# Altium PCB QSTL_QD4_2SET_38PAD.PcbDoc (part 2 of 2)
Units mm, origin at the board's own origin, x right, y up, seen from the top; angles counter-clockwise.
Board outline 32.6 x 99.03 mm, 6 copper layers (L1_GND, L2_DC_A, L3_DC_B, L4_GND, L5_GND, L6_RF_QD), stack 1.588 mm thick; 50 components, 71 nets, 241 pads, 1590 vias.
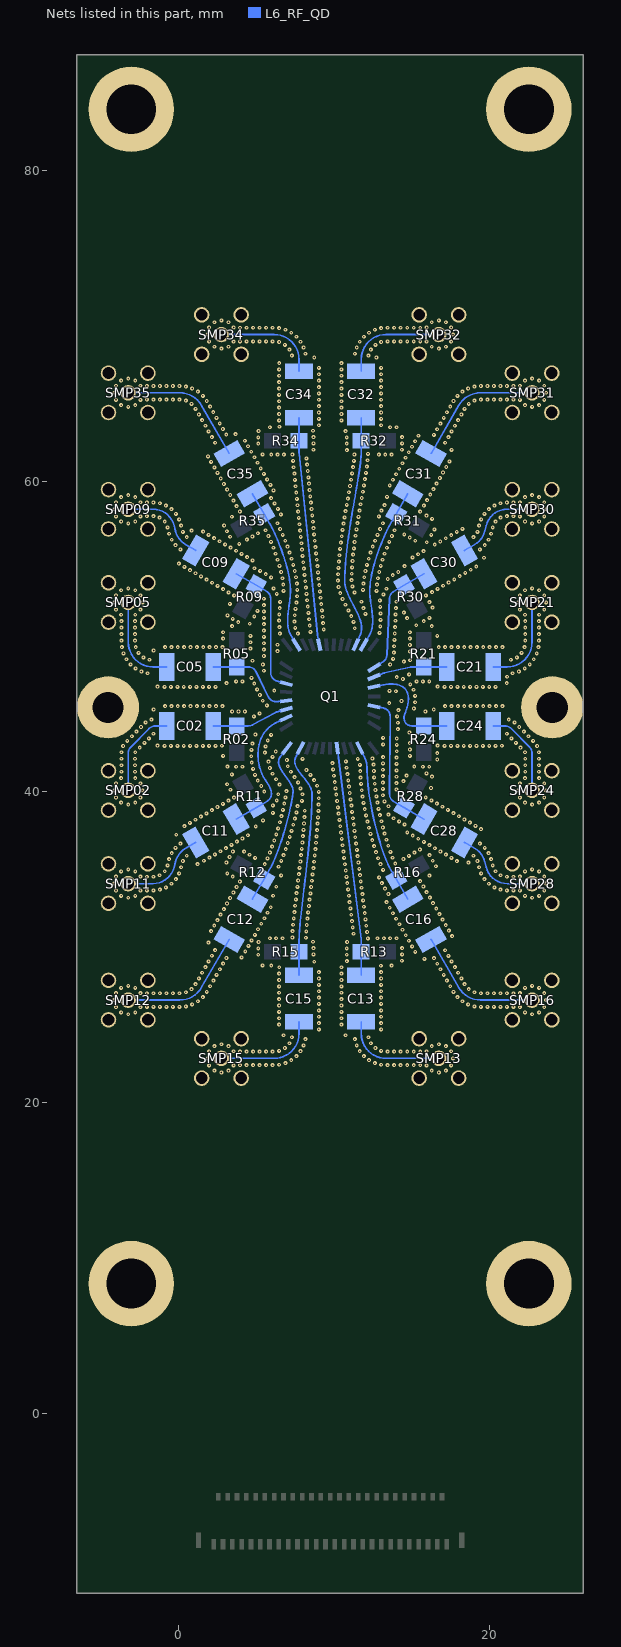
[diagram p6: the nets of this part, all layers, seen from the top]

## Via types
v1: diameter 0.25, hole 0.1, L5_GND to L6_RF_QD, 1514 vias
v2: diameter 0.4, hole 0.2, L1_GND to L6_RF_QD, 38 vias
v3: diameter 0.3, hole 0.2, L1_GND to L6_RF_QD, 22 vias
v4: diameter 0.5, hole 0.25, L1_GND to L6_RF_QD, 16 vias

## Nets (pads, with @x,y where several pads share a name; then routed paths per layer and width w, separated by ;. In a path a pad name is that pad's centre, name@x,y a point inside that pad or via, vN(x,y) a via of type N, cw(c..) or ccw(c..) an arc to the next point about the centre after c; other vN are vias at no path point) (continued)
GND: pad.A3 pad.A4 pad.P1 pad.P2 pad.P3 pad.P4 SMP02.2 SMP02.3 SMP02.4 SMP02.5 SMP05.2 SMP05.3 SMP05.4 SMP05.5 SMP09.2 SMP09.3 SMP09.4 SMP09.5 SMP11.2 SMP11.3 SMP11.4 SMP11.5 SMP12.2 SMP12.3 SMP12.4 SMP12.5 SMP13.2 SMP13.3 SMP13.4 SMP13.5 SMP15.2 SMP15.3 SMP15.4 SMP15.5 SMP16.2 SMP16.3 SMP16.4 SMP16.5 SMP21.2 SMP21.3 SMP21.4 SMP21.5 SMP24.2 SMP24.3 SMP24.4 SMP24.5 SMP28.2 SMP28.3 SMP28.4 SMP28.5 SMP30.2 SMP30.3 SMP30.4 SMP30.5 SMP31.2 SMP31.3 SMP31.4 SMP31.5 SMP32.2 SMP32.3 SMP32.4 SMP32.5 SMP34.2 SMP34.3 SMP34.4 SMP34.5 SMP35.2 SMP35.3 SMP35.4 SMP35.5
  other v1: 2.75,21.94 16.75,21.94 2.295,22.062 3.205,22.062 16.295,22.062 17.205,22.062 1.962,22.395 3.538,22.395 3.948,22.412 4.368,22.412 4.788,22.412 5.208,22.412 5.628,22.412 6.048,22.412 13.452,22.412 13.872,22.412 14.292,22.412 14.712,22.412 15.132,22.412 15.552,22.412 15.962,22.395 17.538,22.395 6.467,22.437 13.033,22.437 6.872,22.544 12.628,22.544 7.247,22.732 12.253,22.732 1.84,22.85 17.66,22.85 7.575,22.993 11.925,22.993 3.948,23.288 4.368,23.288 4.788,23.288 5.208,23.288 5.628,23.288 6.048,23.288 13.452,23.288 13.872,23.288 14.292,23.288 14.712,23.288 15.132,23.288 15.552,23.288 1.962,23.305 3.538,23.305 7.843,23.315 11.657,23.315 15.962,23.305 17.538,23.305 6.464,23.331 13.036,23.331 6.839,23.515 12.661,23.515 2.295,23.638 3.205,23.638 16.295,23.638 17.205,23.638 8.039,23.686 11.461,23.686 2.75,23.76 16.75,23.76 7.126,23.819 12.374,23.819 8.156,24.089 11.344,24.089 7.286,24.205 12.214,24.205 6.751,24.333 10.751,24.333 9.03,24.711 13.03,24.711 6.47,25.023 10.47,25.023 9.03,25.121 13.03,25.121 6.47,25.433 10.47,25.433 9.03,25.531 13.03,25.531 -3.25,25.69 22.75,25.69 -3.705,25.812 -2.795,25.812 22.295,25.812 23.205,25.812 6.47,25.843 10.47,25.843 9.03,25.941 13.03,25.941 -4.038,26.145 -2.462,26.145 21.962,26.145 23.538,26.145 -2.052,26.162 -1.632,26.162 -1.212,26.162 -0.792,26.162 -0.372,26.162 0.048,26.162 19.452,26.162 19.872,26.162 20.292,26.162 20.712,26.162 21.132,26.162 21.552,26.162 0.466,26.2 19.034,26.2 6.47,26.253 10.47,26.253 0.867,26.322 18.633,26.322 9.03,26.351 13.03,26.351 1.234,26.524 18.266,26.524 -4.16,26.6 23.66,26.6 6.47,26.663 10.47,26.663 9.03,26.761 13.03,26.761 1.552,26.797 17.948,26.797 -2.052,27.038 -1.632,27.038 -1.212,27.038 -0.792,27.038 -0.372,27.038 0.048,27.038 19.452,27.038 19.872,27.038 20.292,27.038 20.712,27.038 21.132,27.038 21.552,27.038 -4.038,27.055 -2.462,27.055 21.962,27.055 23.538,27.055 6.47,27.073 10.47,27.073 0.461,27.104 19.039,27.104 1.808,27.129 17.692,27.129 9.03,27.171 13.03,27.171 0.823,27.312 18.677,27.312 -3.705,27.388 -2.795,27.388 22.295,27.388 23.205,27.388 2.019,27.493 6.47,27.483 10.47,27.483 17.481,27.493 -3.25,27.51 22.75,27.51 9.03,27.581 13.03,27.581 1.089,27.634 18.411,27.634 2.229,27.856 17.271,27.856 6.47,27.893 10.47,27.893 1.299,27.998 9.03,27.991 13.03,27.991 18.201,27.998 2.439,28.22 17.061,28.22 6.47,28.303 10.47,28.303 1.509,28.361 17.991,28.361 9.03,28.401 13.03,28.401 2.649,28.584 16.851,28.584 6.47,28.713 10.47,28.713 1.719,28.725 17.781,28.725 13.014,28.809 5.401,28.833 5.957,28.82 13.707,28.82 16.646,28.939 2.859,28.948 1.929,29.089 8.726,29.072 17.571,29.089 10.83,29.114 14.374,29.131 15.818,29.251 3.069,29.311 16.436,29.303 4.048,29.349 17.366,29.444 2.139,29.453 5.12,29.523 10.82,29.523 8.68,29.541 14.38,29.541 15.23,29.708 4.287,29.737 2.349,29.816 17.156,29.808 5.12,29.933 10.82,29.933 8.68,29.951 14.38,29.951 15.025,30.063 4.492,30.093 1.911,30.298 5.147,30.34 10.847,30.34 8.646,30.356 14.82,30.418 4.697,30.448 5.866,30.58 6.276,30.58 6.686,30.58 12.18,30.576 12.796,30.58 13.206,30.58 13.616,30.58 14.026,30.579 8.191,30.618 7.315,30.631 17.603,30.717 14.615,30.773 4.902,30.803 11.26,30.874 12.129,30.983 2.085,31.043 7.336,31.04 8.213,31.027 17.398,31.072 14.41,31.128 5.107,31.158 11.209,31.281 2.29,31.398 12.079,31.39 17.193,31.427 7.369,31.449 8.248,31.436 14.205,31.483 5.312,31.513 11.159,31.688 2.495,31.753 16.988,31.782 12.028,31.797 14,31.838 7.409,31.857 8.288,31.844 5.517,31.868 2.7,32.108 11.108,32.095 16.783,32.137 13.795,32.193 11.977,32.204 5.722,32.223 7.452,32.265 8.332,32.251 2.905,32.463 16.578,32.492 11.057,32.502 13.59,32.548 5.927,32.578 11.927,32.611 7.499,32.672 8.379,32.659 3.11,32.818 16.373,32.847 13.385,32.904 11.007,32.909 11.876,33.017 7.546,33.079 8.427,33.066 3.315,33.173 -3.25,33.19 16.168,33.203 22.75,33.19 -3.705,33.312 -2.795,33.312 22.295,33.312 23.205,33.312 6.075,33.321 10.956,33.315 11.825,33.424 13.496,33.431 7.595,33.486 8.476,33.473 3.52,33.528 15.963,33.558 -4.038,33.645 -2.462,33.645 -2.052,33.662 -1.632,33.662 21.132,33.662 21.552,33.662 21.962,33.645 23.538,33.645 -1.216,33.714 20.716,33.714 10.905,33.722 13.283,33.78 11.775,33.831 -0.823,33.859 20.323,33.859 3.725,33.883 6.284,33.896 7.644,33.893 8.524,33.88 15.758,33.913 -0.472,34.089 19.972,34.089 -4.16,34.1 23.66,34.1 10.855,34.129 13.078,34.135 3.936,34.234 11.724,34.238 15.54,34.258 7.692,34.301 8.573,34.287 -0.183,34.392 19.683,34.392 12.898,34.501 -4.038,34.555 -2.462,34.555 -2.052,34.538 -1.632,34.538 3.481,34.548 10.804,34.536 21.132,34.538 21.552,34.538 21.962,34.555 23.538,34.555 16.135,34.615 -1.227,34.636 6.598,34.634 11.673,34.645 20.727,34.636 7.741,34.708 8.621,34.694 0.029,34.753 3.126,34.753 19.471,34.753 -3.705,34.888 -2.795,34.888 -0.901,34.896 20.401,34.896 22.295,34.888 23.205,34.888 10.753,34.943 13.163,34.982 -3.25,35.01 22.75,35.01 11.623,35.052 7.788,35.115 8.668,35.102 0.158,35.152 19.342,35.152 6.436,35.183 16.557,35.217 -0.716,35.269 20.216,35.269 1.216,35.353 5.543,35.353 10.703,35.35 12.992,35.355 13.939,35.389 3.076,35.459 11.572,35.459 18.65,35.452 8.714,35.509 7.834,35.522 0.273,35.556 1.617,35.57 6.6,35.558 17.912,35.553 19.227,35.556 16.357,35.575 -0.613,35.676 14.466,35.683 20.113,35.676 5.719,35.724 4.918,35.75 12.841,35.736 1.973,35.775 10.652,35.757 13.771,35.763 17.557,35.758 3.281,35.814 11.521,35.865 0.522,35.89 14.821,35.888 18.978,35.89 8.758,35.917 6.751,35.94 7.878,35.93 16.152,35.93 4.563,35.955 17.202,35.963 2.328,35.98 -0.451,36.063 19.951,36.063 5.875,36.103 15.176,36.093 12.704,36.123 13.624,36.146 3.486,36.168 4.207,36.16 10.601,36.164 16.847,36.168 2.683,36.185 11.471,36.272 15.532,36.297 6.891,36.325 8.8,36.324 7.921,36.338 16.492,36.373 -0.205,36.402 3.038,36.39 19.705,36.402 6.019,36.487 12.578,36.512 13.491,36.533 10.551,36.57 16.137,36.578 3.393,36.595 0.111,36.678 11.42,36.679 19.389,36.678 7.023,36.713 8.84,36.732 7.962,36.746 15.782,36.783 3.748,36.8 6.154,36.874 12.46,36.905 13.367,36.924 10.5,36.977 15.427,36.988 4.103,37.005 11.369,37.086 7.148,37.103 8.878,37.141 7.999,37.154 15.072,37.193 4.458,37.21 -0.16,37.244 6.281,37.264 12.349,37.3 13.253,37.318 10.449,37.384 14.717,37.398 7.266,37.496 11.319,37.493 8.912,37.549 8.034,37.562 19.463,37.614 6.4,37.656 12.246,37.697 13.146,37.714 4.957,37.78 0.363,37.802 10.399,37.791 19.108,37.819 7.376,37.891 11.268,37.9 14.549,37.91 8.943,37.958 8.066,37.971 0.718,38.007 18.753,38.024 6.512,38.05 12.15,38.095 13.046,38.112 14.19,38.106 5.426,38.173 1.073,38.212 10.348,38.198 18.398,38.229 7.479,38.288 11.217,38.307 13.835,38.311 8.093,38.38 8.97,38.367 1.428,38.417 18.043,38.434 6.616,38.447 12.061,38.496 12.954,38.511 13.496,38.538 10.297,38.605 1.783,38.622 17.688,38.639 6.067,38.655 7.573,38.687 11.167,38.713 8.115,38.79 8.992,38.777 2.138,38.827 6.711,38.846 17.333,38.844 11.98,38.897 12.869,38.912 10.247,39.012 2.493,39.032 16.977,39.049 7.658,39.088 13.509,39.081 11.116,39.12 6.063,39.135 -3.25,39.19 9.008,39.186 22.75,39.19 2.848,39.237 6.797,39.247 16.622,39.254 11.906,39.301 -3.705,39.312 -2.795,39.312 12.793,39.315 22.295,39.312 23.205,39.312 13.251,39.395 7.935,39.423 10.196,39.418 3.203,39.442 6.312,39.457 16.267,39.459 11.065,39.527 9.018,39.596 -4.038,39.645 -2.462,39.645 3.562,39.64 6.871,39.65 15.906,39.649 21.962,39.645 23.538,39.645 11.841,39.705 12.725,39.719 13.141,39.788 10.145,39.825 6.408,39.852 7.969,39.849 11.015,39.934 9.014,40.006 5.505,40.023 6.929,40.056 -4.16,40.1 -2.34,40.1 11.785,40.112 21.84,40.1 23.66,40.1 3.324,40.139 12.667,40.125 14.018,40.163 13.142,40.197 7.84,40.235 10.095,40.232 16.243,40.255 10.964,40.341 5.312,40.384 8.913,40.402 6.493,40.474 3.119,40.494 11.74,40.519 12.619,40.532 -4.038,40.555 -2.462,40.555 14.021,40.573 21.962,40.555 23.538,40.555 7.684,40.62 13.145,40.607 10.044,40.639 14.468,40.701 5.088,40.727 10.913,40.748 8.72,40.763 6.273,40.817 -3.705,40.888 -2.795,40.888 22.295,40.888 23.205,40.888 11.708,40.928 7.462,40.956 12.585,40.941 14.023,40.982 16.307,40.988 13.148,41.017 9.994,41.046 14.673,41.056 4.914,41.097 8.479,41.094 3.429,41.131 10.863,41.155 6.041,41.171 15.955,41.198 -3.688,41.298 -2.812,41.298 7.224,41.301 22.312,41.298 23.188,41.298 11.691,41.337 12.567,41.35 8.222,41.414 14.026,41.392 13.151,41.427 9.943,41.453 4.786,41.487 5.873,41.544 10.812,41.561 3.136,41.633 3.692,41.62 4.102,41.62 15.166,41.633 15.722,41.62 16.132,41.62 7.019,41.657 -3.688,41.718 -2.812,41.718 22.312,41.718 23.188,41.718 11.669,41.746 12.552,41.76 14.029,41.802 13.153,41.837 9.892,41.86 4.704,41.888 5.782,41.951 10.761,41.968 6.963,42.057 16.645,42.091 -3.688,42.138 -2.812,42.138 7.976,42.126 11.524,42.126 22.312,42.138 23.188,42.138 12.466,42.155 14.032,42.212 13.156,42.247 6.045,42.255 4.667,42.296 2.855,42.323 14.885,42.323 16.645,42.501 5.545,42.532 -2.797,42.556 22.297,42.556 -3.686,42.558 23.186,42.558 6.252,42.606 14.035,42.622 4.679,42.706 14.885,42.733 -2.505,42.857 22.005,42.857 5.6,42.938 -3.575,42.96 23.075,42.96 -1.364,42.983 -0.908,42.97 -0.498,42.97 -0.088,42.97 0.322,42.97 0.732,42.97 1.142,42.97 1.552,42.97 1.962,42.97 2.372,42.97 2.782,42.973 16.666,42.983 17.122,42.97 17.532,42.97 17.942,42.97 18.352,42.97 18.762,42.97 19.172,42.97 19.582,42.97 19.992,42.97 20.402,42.97 20.812,42.973 14.038,43.032 13.162,43.067 4.741,43.111 -2.21,43.156 14.885,43.143 21.71,43.156 -3.313,43.286 22.813,43.286 5.733,43.325 14.041,43.442 -1.922,43.447 21.415,43.454 13.165,43.477 -3.018,43.584 22.518,43.584 5.954,43.669 4.942,43.699 -1.627,43.746 21.127,43.746 14.847,43.827 -2.723,43.883 22.223,43.883 14.109,44.044 -2.427,44.182 21.927,44.182 14.11,44.454 -2.127,44.475 21.627,44.475 -1.753,44.659 21.253,44.659 4.845,44.867 14.059,44.863 5.205,45.062 3.441,45.18 3.851,45.18 4.261,45.179 15.881,45.18 14.146,45.269 -1.61,45.308 16.42,45.308 15.14,45.373 2.811,45.522 20.841,45.522 -0.879,45.53 -0.469,45.53 -0.059,45.53 0.351,45.53 0.761,45.53 1.171,45.53 1.581,45.53 1.991,45.53 2.401,45.53 17.151,45.53 17.561,45.53 17.971,45.53 18.381,45.53 18.791,45.53 19.201,45.53 19.611,45.53 20.021,45.53 20.431,45.53 5.683,45.57 13.554,45.722 15.216,45.775 14.344,45.858 5.412,45.874 15.22,46.184 5.23,46.241 13.98,46.485 13.572,46.511 6.152,46.523 15.122,46.581 5.048,46.609 -0.908,46.77 -0.498,46.77 -0.088,46.77 0.322,46.77 0.732,46.77 1.142,46.77 1.552,46.77 1.962,46.77 2.372,46.77 17.122,46.77 17.532,46.77 17.942,46.77 18.352,46.77 18.762,46.77 19.172,46.77 19.582,46.77 19.992,46.77 20.402,46.77 -1.364,46.783 16.666,46.783 14.906,46.927 4.867,46.977 3.09,47.014 21.12,47.014 3.692,47.12 4.102,47.12 15.312,47.12 15.722,47.12 16.132,47.12 14.431,47.272 4.686,47.345 14.036,47.395 21.145,47.421 14.836,47.575 -2.001,47.643 21.501,47.643 -2.405,47.757 21.905,47.757 5.489,47.806 -2.776,47.951 22.276,47.951 -3.1,48.218 5.424,48.207 13.615,48.207 22.6,48.218 14.493,48.395 4.753,48.451 14.894,48.481 -1.886,48.512 21.386,48.512 -3.362,48.545 22.862,48.545 13.806,48.567 -2.273,48.669 21.773,48.669 5.487,48.752 -3.552,48.919 23.052,48.919 -2.579,48.953 22.079,48.953 13.852,48.973 14.885,49.053 6.363,49.07 -1.61,49.108 5.487,49.162 4.615,49.231 -3.662,49.323 -2.766,49.326 -0.879,49.33 -0.469,49.33 -0.059,49.33 0.351,49.33 0.761,49.33 1.171,49.33 1.581,49.33 1.991,49.33 2.401,49.33 2.811,49.322 16.741,49.329 17.151,49.33 17.561,49.33 17.971,49.33 18.381,49.33 18.791,49.33 19.201,49.33 19.611,49.33 20.021,49.33 20.431,49.33 20.841,49.322 22.266,49.326 23.162,49.323 13.871,49.382 14.885,49.463 6.362,49.48 5.486,49.572 4.615,49.641 -3.688,49.742 -2.812,49.742 22.312,49.742 23.188,49.742 13.89,49.792 2.855,49.873 14.885,49.873 5.486,49.982 4.615,50.051 16.645,50.051 -3.688,50.162 -2.812,50.162 22.312,50.162 23.188,50.162 6.511,50.199 7.673,50.192 13.91,50.201 12.936,50.238 2.855,50.283 8.476,50.304 14.885,50.283 5.486,50.392 9.34,50.466 11.334,50.543 -3.688,50.582 -2.812,50.582 7.502,50.562 22.312,50.582 23.188,50.582 6.478,50.614 13.929,50.611 3.441,50.68 12.98,50.663 16.291,50.679 8.435,50.711 15.292,50.734 5.486,50.802 4.574,50.832 9.299,50.874 3.836,50.934 11.264,50.946 7.451,50.968 -3.688,51.002 -2.812,51.002 15.78,51.001 22.312,51.002 23.188,51.002 6.468,51.03 13.948,51.02 12.999,51.083 3.481,51.139 8.394,51.119 14.703,51.191 5.485,51.212 16.135,51.206 9.258,51.282 4.864,51.308 11.111,51.325 3.142,51.365 7.47,51.377 -3.705,51.412 -2.795,51.412 22.295,51.412 23.205,51.412 6.477,51.436 13.967,51.43 12.024,51.46 12.999,51.494 8.352,51.527 14.498,51.546 5.485,51.622 5.069,51.663 9.217,51.69 10.926,51.691 -4.038,51.745 -2.462,51.745 21.962,51.745 23.538,51.745 7.52,51.784 6.504,51.837 11.892,51.841 13.987,51.84 16.344,51.87 12.975,51.915 8.311,51.935 5.485,52.032 10.735,52.054 9.175,52.098 3.294,52.109 -4.16,52.2 -2.34,52.2 7.576,52.19 21.84,52.2 23.66,52.2 16.139,52.225 6.526,52.243 11.758,52.245 14.006,52.249 12.957,52.329 8.27,52.343 10.554,52.422 5.485,52.442 9.134,52.505 7.621,52.597 -4.038,52.655 -2.462,52.655 3.572,52.657 15.916,52.653 21.962,52.655 23.538,52.655 13.177,52.72 6.312,52.754 8.229,52.751 10.401,52.802 3.212,52.853 11.321,52.852 16.317,52.87 9.093,52.913 6.759,52.945 12.741,52.945 -3.705,52.988 -2.795,52.988 22.295,52.988 23.205,52.988 7.634,53.007 11.866,53.007 2.857,53.058 13.367,53.08 16.673,53.075 -3.25,53.11 6.109,53.107 22.75,53.11 8.187,53.159 10.294,53.197 11.182,53.238 2.502,53.263 17.028,53.28 9.051,53.321 6.734,53.354 12.766,53.354 7.609,53.416 11.891,53.416 2.147,53.468 17.383,53.485 8.146,53.567 10.254,53.605 11.13,53.643 1.792,53.673 17.738,53.69 9.01,53.729 13.463,53.712 6.675,53.76 12.825,53.76 5.953,53.815 7.553,53.822 11.947,53.822 1.437,53.878 18.093,53.895 13.783,53.959 8.105,53.975 5.601,54.026 10.261,54.015 11.139,54.053 1.082,54.083 18.448,54.1 8.969,54.137 6.591,54.161 12.909,54.161 14.138,54.164 5.246,54.231 7.475,54.225 12.025,54.225 0.727,54.288 18.803,54.305 8.063,54.383 4.878,54.404 10.281,54.424 11.161,54.462 0.372,54.493 19.158,54.51 8.927,54.545 14.54,54.544 6.488,54.558 13.012,54.558 7.379,54.623 12.121,54.623 0.017,54.698 8.022,54.791 10.31,54.833 11.192,54.871 4.763,54.914 6.37,54.95 13.13,54.95 8.886,54.953 7.267,55.018 12.233,55.018 19.657,55.08 15.063,55.102 4.408,55.119 7.981,55.198 10.347,55.242 11.231,55.279 15.418,55.307 4.053,55.324 6.238,55.339 13.262,55.339 8.845,55.361 7.142,55.408 12.358,55.408 15.773,55.512 3.698,55.529 7.939,55.606 0.111,55.622 19.389,55.622 10.391,55.649 11.277,55.687 3.343,55.734 6.095,55.723 13.405,55.723 8.803,55.769 7.005,55.795 12.495,55.795 -0.205,55.898 19.705,55.898 2.988,55.939 16.483,55.922 3.899,55.977 7.898,56.014 10.441,56.056 11.329,56.093 15.967,56.075 5.941,56.103 13.559,56.103 2.633,56.144 16.838,56.127 6.858,56.177 8.762,56.177 12.642,56.177 15.229,56.176 -0.451,56.237 4.388,56.244 19.951,56.237 2.277,56.349 17.193,56.332 14.874,56.381 0.522,56.41 7.857,56.422 18.978,56.41 3.311,56.434 4.743,56.449 10.495,56.463 5.776,56.478 11.385,56.499 13.724,56.478 16.256,56.55 17.548,56.537 1.922,56.554 6.7,56.556 12.8,56.556 8.721,56.585 14.519,56.586 -0.613,56.624 20.113,56.624 5.098,56.654 0.273,56.744 17.903,56.742 19.227,56.744 1.567,56.759 3.106,56.789 0.833,56.831 7.815,56.83 5.597,56.847 13.903,56.847 10.554,56.868 11.446,56.905 16.461,56.905 6.532,56.93 12.968,56.93 18.262,56.94 8.679,56.993 -0.716,57.031 20.216,57.031 0.158,57.148 2.926,57.154 19.342,57.148 7.774,57.238 10.617,57.274 -3.25,57.29 6.35,57.297 11.51,57.31 13.15,57.297 22.75,57.29 -3.705,57.412 -2.795,57.412 -0.901,57.404 8.638,57.4 20.401,57.404 22.295,57.412 23.205,57.412 0.029,57.547 19.471,57.547 16.31,57.584 -1.227,57.664 7.733,57.646 20.727,57.664 10.682,57.678 11.576,57.714 -4.038,57.745 -2.462,57.745 3.429,57.722 12.894,57.739 21.962,57.745 23.538,57.745 -2.052,57.762 -1.632,57.762 21.132,57.762 21.552,57.762 15.955,57.789 8.597,57.808 6.584,57.871 -0.183,57.908 19.683,57.908 15.548,58.049 3.943,58.058 7.691,58.054 10.749,58.083 11.644,58.119 13.048,58.113 -4.16,58.2 23.66,58.2 -0.472,58.211 6.385,58.229 8.555,58.216 19.972,58.211 3.73,58.408 -0.823,58.441 15.787,58.437 20.323,58.441 7.65,58.462 13.253,58.468 10.818,58.487 11.714,58.523 6.18,58.584 -1.216,58.586 20.716,58.586 8.514,58.624 -4.038,58.655 -2.462,58.655 -2.052,58.638 -1.632,58.638 21.132,58.638 21.552,58.638 21.962,58.655 23.538,58.655 3.525,58.763 15.992,58.793 7.609,58.87 10.889,58.891 5.948,58.918 11.784,58.927 -3.705,58.988 -2.795,58.988 22.295,58.988 23.205,58.988 13.411,58.998 8.473,59.032 -3.25,59.11 3.32,59.118 22.75,59.11 16.197,59.148 7.567,59.278 10.959,59.295 11.855,59.331 6.103,59.417 8.432,59.44 3.115,59.473 16.402,59.503 7.526,59.686 11.029,59.699 11.924,59.735 13.585,59.743 5.898,59.772 2.91,59.828 8.39,59.848 16.607,59.858 7.485,60.093 11.098,60.103 13.79,60.098 5.693,60.127 11.992,60.139 2.705,60.183 16.812,60.213 8.349,60.256 13.995,60.453 5.488,60.482 7.444,60.501 11.164,60.508 2.5,60.538 12.056,60.544 17.017,60.568 8.308,60.664 14.2,60.808 5.283,60.837 2.295,60.893 7.402,60.909 11.224,60.913 17.222,60.923 12.114,60.95 8.266,61.072 14.405,61.163 5.078,61.192 2.09,61.248 17.427,61.278 7.361,61.317 11.276,61.32 12.161,61.357 8.225,61.48 14.61,61.518 4.873,61.547 1.885,61.604 5.401,61.733 5.957,61.72 6.367,61.72 6.777,61.72 7.32,61.725 11.309,61.728 12.887,61.72 13.297,61.72 13.707,61.72 12.187,61.766 14.815,61.873 4.668,61.903 10.83,62.014 8.674,62.031 14.374,62.031 17.575,62.021 15.02,62.228 4.463,62.258 5.12,62.423 8.68,62.441 10.82,62.423 14.38,62.441 2.349,62.484 17.151,62.484 15.225,62.583 4.258,62.613 2.139,62.847 5.12,62.833 8.68,62.851 10.82,62.833 14.38,62.851 17.361,62.847 15.436,62.934 16.431,62.989 3.059,63.006 3.659,63.042 1.929,63.211 10.751,63.233 17.571,63.211 5.147,63.24 8.646,63.256 16.641,63.352 2.849,63.37 5.866,63.48 13.616,63.48 14.026,63.479 6.48,63.514 1.719,63.575 17.781,63.575 9.03,63.611 13.03,63.611 2.644,63.725 16.851,63.716 1.509,63.939 6.47,63.923 10.47,63.923 17.991,63.939 9.03,64.021 13.03,64.021 2.434,64.089 17.061,64.08 1.299,64.302 18.201,64.302 6.47,64.333 10.47,64.333 2.224,64.452 9.03,64.431 13.03,64.431 17.271,64.444 1.089,64.666 18.411,64.666 6.47,64.743 10.47,64.743 -3.25,64.79 2.019,64.807 17.481,64.807 22.75,64.79 9.03,64.841 13.03,64.841 -3.705,64.912 -2.795,64.912 22.295,64.912 23.205,64.912 0.823,64.988 18.677,64.988 6.47,65.153 10.47,65.153 1.808,65.171 17.692,65.171 0.461,65.196 19.039,65.196 -4.038,65.245 -2.462,65.245 -2.052,65.262 -1.632,65.262 -1.212,65.262 -0.792,65.262 -0.372,65.262 0.048,65.262 9.03,65.251 13.03,65.251 19.452,65.262 19.872,65.262 20.292,65.262 20.712,65.262 21.132,65.262 21.552,65.262 21.962,65.245 23.538,65.245 1.552,65.503 17.948,65.503 6.47,65.563 10.47,65.563 9.03,65.661 13.03,65.661 -4.16,65.7 23.66,65.7 1.234,65.776 18.266,65.776 6.47,65.973 10.47,65.973 0.867,65.978 18.633,65.978 9.03,66.071 13.03,66.071 0.466,66.1 19.034,66.1 -2.052,66.138 -1.632,66.138 -1.212,66.138 -0.792,66.138 -0.372,66.138 0.048,66.138 19.452,66.138 19.872,66.138 20.292,66.138 20.712,66.138 21.132,66.138 21.552,66.138 -4.038,66.155 -2.462,66.155 21.962,66.155 23.538,66.155 6.47,66.383 10.47,66.383 9.03,66.481 13.03,66.481 -3.705,66.488 -2.795,66.488 22.295,66.488 23.205,66.488 -3.25,66.61 22.75,66.61 6.47,66.793 10.47,66.793 9.03,66.891 13.03,66.891 6.47,67.203 10.47,67.203 9.03,67.301 13.03,67.301 6.47,67.613 10.47,67.613 8.726,67.972 12.726,67.972 7.286,68.095 12.214,68.095 8.156,68.211 11.344,68.211 7.126,68.481 12.374,68.481 2.75,68.54 16.75,68.54 8.039,68.614 11.461,68.614 2.295,68.662 3.205,68.662 16.295,68.662 17.205,68.662 6.839,68.785 12.661,68.785 6.464,68.969 13.036,68.969 1.962,68.995 3.538,68.995 7.843,68.985 11.657,68.985 15.962,68.995 17.538,68.995 3.948,69.012 4.368,69.012 4.788,69.012 5.208,69.012 5.628,69.012 6.048,69.012 13.452,69.012 13.872,69.012 14.292,69.012 14.712,69.012 15.132,69.012 15.552,69.012 7.575,69.307 11.925,69.307 1.84,69.45 17.66,69.45 7.247,69.568 12.253,69.568 6.872,69.756 12.628,69.756 3.948,69.888 4.368,69.888 4.788,69.888 5.208,69.888 5.628,69.888 6.048,69.888 6.467,69.863 13.033,69.863 13.452,69.888 13.872,69.888 14.292,69.888 14.712,69.888 15.132,69.888 15.552,69.888 1.962,69.905 3.538,69.905 15.962,69.905 17.538,69.905 2.295,70.238 3.205,70.238 16.295,70.238 17.205,70.238 2.75,70.36 16.75,70.36
MW02: C34.2 Q1.2 R34.1 | length 14.3
  L6_RF_QD w0.11: C34.2@7.75,64.1 R34.1@7.75,62.6 7.75,61.85 ccw(c8.3,61.85) 7.751,61.822 ccw(c8.3,61.85) 7.753,61.795 8.935,50.123 ccw(c9.482,50.178) 8.937,50.105 ccw(c9.482,50.178) 8.94,50.088 ccw(c9.308,50.149) 8.941,50.082 cw(c7.644,49.846) 8.942,50.077 ccw(c15.479,51.239) 8.96,49.978 cw(c-10.597,46.197) 8.979,49.88
MW05: C35.2 Q1.5 R35.1 | length 9.9
  L6_RF_QD w0.11: C35.2@4.75,59.201 R35.1@5.5,57.902 5.875,57.252 cw(c2.147,55.1) 5.964,57.091 cw(c-1.705,53.091) 6.047,56.926 cw(c-2.907,52.496) 6.15,56.712 cw(c-5.631,51.228) 6.249,56.495 cw(c-6.814,50.704) 6.479,55.946 cw(c-6.983,50.637) 6.685,55.388 cw(c-6.066,50.956) 6.789,55.077 cw(c-4.507,51.456) 6.885,54.763 cw(c-3.64,51.708) 6.972,54.446 cw(c-1.734,52.199) 7.049,54.125 cw(c-0.817,52.4) 7.111,53.813 cw(c1.02,52.728) 7.158,53.499 cw(c1.796,52.825) 7.187,53.209 cw(c3.341,52.935) 7.197,52.918 cw(c3.735,52.933) 7.191,52.734 cw(c2.044,53.031) 7.177,52.551 cw(c0.636,53.162) 7.157,52.364 cw(c-6.174,53.996) 7.133,52.178 cw(c-38.142,58.363) 7.08,51.802 ccw(c15.074,50.643) 7.034,51.426 ccw(c12.438,50.899) 7.019,51.242 ccw(c10.64,51.013) 7.013,51.057 ccw(c10.08,51.02) 7.016,50.879 ccw(c9.31,50.984) 7.031,50.7 ccw(c9.044,50.951) 7.06,50.528 ccw(c8.695,50.877) 7.105,50.359 ccw(c8.613,50.85) 7.136,50.274 ccw(c8.537,50.821) 7.171,50.19 ccw(c8.522,50.814) 7.19,50.152 ccw(c8.507,50.806) 7.209,50.114 ccw(c8.505,50.805) 7.219,50.095 ccw(c8.502,50.803) 7.23,50.076 ccw(c8.261,50.666) 7.237,50.064 ccw(c11.453,52.541) 7.244,50.052 ccw(c19.769,57.461) 7.296,49.966 cw(c-30.126,27.48) 7.347,49.88
MW09: C09.2 Q1.9 R09.1 | length 8.5
  L6_RF_QD w0.11: C09.2@3.699,54.05 R09.1@4.998,53.3 5.648,52.925 cw(c5.373,52.449) 5.849,52.724 cw(c5.373,52.449) 5.923,52.449 5.925,47.675 ccw(c6.475,47.675) 5.956,47.494 ccw(c6.475,47.675) 6.045,47.333 ccw(c6.475,47.675) 6.106,47.268 ccw(c6.475,47.675) 6.176,47.213 ccw(c6.475,47.675) 6.217,47.189 ccw(c6.475,47.675) 6.26,47.169 ccw(c6.475,47.675) 6.282,47.16 ccw(c6.475,47.675) 6.305,47.152 ccw(c6.443,47.575) 6.316,47.149 ccw(c6.853,48.953) 6.327,47.145 ccw(c8.149,53.417) 6.424,47.118 cw(c1.246,28.22) Q1.9@6.52,47.091
MW11: C05.2 Q1.11 R05.1 | length 5.5
  L6_RF_QD w0.11: C05.2@2.235,48.05 R05.1@3.735,48.05 4.485,48.05 cw(c4.485,47.5) 4.776,47.967 cw(c4.485,47.5) 4.978,47.743 5.776,46.122 ccw(c6.27,46.365) 5.875,45.982 ccw(c6.27,46.365) 6.012,45.88 ccw(c6.27,46.365) 6.088,45.846 ccw(c6.27,46.365) 6.168,45.825 ccw(c6.27,46.365) 6.209,45.819 ccw(c6.27,46.365) 6.25,45.816 ccw(c6.27,46.365) 6.274,45.815 ccw(c6.27,46.365) 6.297,45.816 ccw(c6.275,46.26) 6.309,45.817 ccw(c6.165,47.695) 6.321,45.818 ccw(c5.779,52.352) 6.42,45.827 cw(c8.345,26.249) Q1.11@6.52,45.836
MW12: C02.2 Q1.12 R02.1 | length 4.5
  L6_RF_QD w0.11: C02.2@2.235,44.25 R02.1@3.735,44.25 4.485,44.25 ccw(c4.485,44.8) 4.62,44.267 ccw(c4.485,44.8) 4.746,44.316 6.214,45.109 cw(c6.475,44.625) 6.244,45.124 cw(c6.475,44.625) 6.275,45.137 cw(c6.475,44.625) 6.29,45.143 cw(c6.475,44.625) 6.306,45.148 cw(c6.443,44.725) 6.317,45.152 cw(c6.856,43.331) 6.327,45.155 cw(c8.262,38.48) 6.424,45.182 ccw(c0.909,65.287) Q1.12@6.52,45.209
MW13: C11.2 Q1.13 R11.1 | length 8.4
  L6_RF_QD w0.11: C11.2@3.699,38.25 R11.1@4.998,39 5.648,39.375 ccw(c5.207,40.137) 5.764,39.456 ccw(c5.384,39.921) 5.862,39.557 ccw(c5.441,39.878) 5.92,39.653 ccw(c5.454,39.872) 5.957,39.759 ccw(c5.412,39.881) 5.97,39.866 ccw(c5.25,39.885) 5.965,39.974 ccw(c5.122,39.87) 5.944,40.084 ccw(c4.799,39.785) 5.91,40.19 ccw(c4.509,39.68) 5.821,40.389 ccw(c3.448,39.106) 5.709,40.577 ccw(c2.909,38.755) 5.66,40.65 ccw(c-0.012,36.743) 5.61,40.723 cw(c38.773,64.2) 5.571,40.777 cw(c6.58,41.489) 5.535,40.832 cw(c7.547,42.095) 5.419,41.039 cw(c7.951,42.296) 5.323,41.255 cw(c8.103,42.356) 5.24,41.494 cw(c8.305,42.417) 5.176,41.739 cw(c8.332,42.423) 5.131,41.998 cw(c8.261,42.414) 5.107,42.26 cw(c8.169,42.409) 5.106,42.526 cw(c7.915,42.419) 5.129,42.791 cw(c7.77,42.438) 5.177,43.052 cw(c7.492,42.504) 5.252,43.306 cw(c7.37,42.548) 5.357,43.551 cw(c7.199,42.633) 5.491,43.782 cw(c7.149,42.666) 5.659,43.999 cw(c7.14,42.674) 5.856,44.19 cw(c7.165,42.645) 5.975,44.284 cw(c7.219,42.571) 6.101,44.368 cw(c7.242,42.534) 6.163,44.406 cw(c7.278,42.471) 6.227,44.441 cw(c7.288,42.452) 6.26,44.458 cw(c7.311,42.407) 6.293,44.475 cw(c7.131,42.773) 6.316,44.486 cw(c9.362,38.085) 6.339,44.497 cw(c12.303,31.848) 6.429,44.539 ccw(c-11.193,82.61) Q1.13@6.52,44.581
MW15: C12.2 Q1.15 R12.1 | length 10.2
  L6_RF_QD w0.11: C12.2@4.75,33.099 R12.1@5.5,34.398 5.875,35.048 ccw(c3.03,36.69) 5.978,35.24 ccw(c-0.27,38.314) 6.071,35.437 ccw(c-1.744,38.982) 6.179,35.686 ccw(c-5.803,40.671) 6.281,35.938 ccw(c-8.681,41.798) 6.512,36.566 ccw(c-14.305,43.735) 6.72,37.202 ccw(c-14.657,43.845) 6.928,37.914 ccw(c-11.951,43.101) 7.111,38.632 ccw(c-9.925,42.626) 7.19,38.986 ccw(c-6.833,41.968) 7.261,39.342 ccw(c-5.607,41.74) 7.293,39.519 ccw(c-3.926,41.451) 7.322,39.696 ccw(c-3.347,41.36) 7.334,39.776 ccw(c-2.563,41.244) 7.346,39.855 cw(c71.84,30.815) 7.356,39.925 ccw(c5.412,40.2) 7.364,39.996 ccw(c6.817,40.053) 7.361,40.135 ccw(c6.533,40.01) 7.329,40.271 ccw(c6.268,39.923) 7.269,40.418 ccw(c5.408,39.497) 7.193,40.558 ccw(c4.732,39.095) 7.098,40.706 ccw(c1.297,36.757) 6.997,40.851 ccw(c-5.268,32.043) 6.89,40.998 cw(c16.046,47.743) 6.783,41.146 cw(c11.697,44.646) 6.683,41.291 cw(c8.873,42.757) 6.59,41.44 cw(c8.264,42.405) 6.516,41.581 cw(c7.477,42.034) 6.46,41.728 cw(c7.23,41.96) 6.431,41.866 cw(c6.977,41.93) 6.433,42.007 cw(c6.94,41.935) 6.448,42.078 cw(c6.948,41.933) 6.473,42.146 cw(c6.965,41.925) 6.489,42.178 cw(c7,41.907) 6.506,42.209 cw(c7.012,41.899) 6.516,42.225 cw(c7.04,41.881) 6.527,42.24 cw(c6.949,41.945) 6.534,42.251 cw(c8.369,40.898) 6.542,42.261 cw(c12.382,37.903) 6.602,42.341 ccw(c-10.736,55.653) 6.663,42.42
MW16: C15.2 Q1.16 R15.1 | length 14.6
  L6_RF_QD w0.11: 7.633,42.42 cw(c-12.339,52.891) 7.586,42.332 ccw(c14.228,38.812) 7.54,42.243 ccw(c9.624,41.174) 7.534,42.231 ccw(c8.012,41.99) 7.528,42.22 ccw(c8.118,41.939) 7.521,42.203 ccw(c8.093,41.95) 7.513,42.186 ccw(c8.083,41.954) 7.501,42.152 ccw(c8.055,41.964) 7.49,42.117 ccw(c8.042,41.967) 7.475,42.044 ccw(c8.052,41.966) 7.47,41.97 ccw(c8.101,41.966) 7.486,41.825 ccw(c8.388,42.031) 7.53,41.685 ccw(c8.653,42.138) 7.601,41.539 ccw(c9.509,42.626) 7.686,41.4 ccw(c10.205,43.093) 7.791,41.254 ccw(c13.891,45.901) 7.902,41.112 ccw(c21.995,52.382) 8.02,40.966 cw(c-0.42,34.071) 8.138,40.819 cw(c3.349,37.043) 8.25,40.672 cw(c5.913,38.942) 8.355,40.52 cw(c6.5,39.321) 8.444,40.371 cw(c7.254,39.728) 8.516,40.214 cw(c7.5,39.823) 8.563,40.058 cw(c7.774,39.884) 8.582,39.897 cw(c6.423,39.861) 8.582,39.843 ccw(c25.495,39.702) 8.582,39.789 cw(c-10.421,39.887) 8.581,39.717 cw(c-11.569,39.897) 8.58,39.645 cw(c-12.141,39.905) 8.578,39.497 cw(c-14.275,39.947) 8.575,39.35 cw(c-15.92,39.989) 8.564,39.02 cw(c-21.094,40.194) 8.549,38.689 cw(c-25.316,40.409) 8.508,38.022 cw(c-38.941,41.37) 8.457,37.355 cw(c-51.943,42.472) 8.325,35.99 cw(c-130.933,50.967) 8.172,34.628 cw(c-232.732,62.923) 8.096,33.987 ccw(c1245.513,-114.695) 8.019,33.345 ccw(c281.036,0.685) 7.951,32.767 ccw(c89,23.245) 7.885,32.189 ccw(c63.463,26.061) 7.833,31.702 ccw(c32.441,29.206) 7.789,31.214 ccw(c25.852,29.743) 7.773,31.005 ccw(c19.187,30.208) 7.76,30.796 ccw(c16.945,30.324) 7.753,30.623 ccw(c13.064,30.45) 7.75,30.45 R15.1@7.75,29.7 C15.2@7.75,28.2
MW21: C13.2 Q1.21 R13.1 | length 14.3
  L6_RF_QD w0.11: 10.264,42.42 ccw(c308.819,79.798) 10.276,42.321 cw(c-88.994,29.859) 10.289,42.221 11.746,30.518 cw(c11.2,30.45) 11.749,30.484 cw(c11.2,30.45) 11.75,30.45 R13.1@11.75,29.7 C13.2@11.75,28.2
MW24: C16.2 Q1.24 R16.1 | length 9.9
  L6_RF_QD w0.11: Q1.24@11.867,42.42 ccw(c103.613,90.521) 11.956,42.251 cw(c10.73,41.605) 12.033,42.077 cw(c10.666,41.582) 12.062,41.988 cw(c10.561,41.552) 12.085,41.897 cw(c10.488,41.535) 12.116,41.713 cw(c10.381,41.523) 12.127,41.527 ccw(c21.387,41.547) 12.137,41.106 ccw(c23.335,41.64) 12.165,40.685 ccw(c25.296,41.807) 12.214,40.216 ccw(c28.656,42.216) 12.277,39.75 ccw(c30.978,42.565) 12.446,38.796 ccw(c34.765,43.336) 12.659,37.851 ccw(c34.594,43.293) 12.774,37.408 ccw(c33.063,42.88) 12.898,36.968 ccw(c31.817,42.515) 13.018,36.573 ccw(c28.037,41.32) 13.147,36.181 ccw(c26.125,40.66) 13.264,35.855 ccw(c21.53,38.944) 13.392,35.533 ccw(c19.956,38.284) 13.451,35.397 ccw(c18.014,37.422) 13.512,35.263 ccw(c17.27,37.065) 13.567,35.154 ccw(c15.857,36.336) 13.625,35.048 R16.1@14,34.398 C16.2@14.75,33.099
MW28: C28.2 Q1.28 R28.1 | length 8.8
  L6_RF_QD w0.11: Q1.28@12.98,45.444 ccw(c16.976,64.507) 13.078,45.424 cw(c11.779,39.063) 13.176,45.403 ccw(c13.461,46.696) 13.182,45.402 cw(c13.103,45.036) 13.187,45.4 cw(c13.063,44.865) 13.199,45.397 cw(c13.063,44.865) 13.211,45.394 cw(c13.063,44.865) 13.234,45.387 cw(c13.063,44.865) 13.256,45.38 cw(c13.063,44.865) 13.3,45.361 cw(c13.063,44.865) 13.342,45.338 cw(c13.063,44.865) 13.42,45.283 cw(c13.063,44.865) 13.487,45.214 cw(c13.063,44.865) 13.581,45.049 cw(c13.063,44.865) 13.613,44.861 13.577,39.855 ccw(c14.127,39.851) 13.65,39.578 ccw(c14.127,39.851) 13.852,39.375 R28.1@14.502,39 C28.2@15.801,38.25
MW30: C24.2 Q1.30 R24.1 | length 6.7
  L6_RF_QD w0.11: 12.98,46.856 ccw(c2.056,98.976) 13.156,46.893 cw(c13.765,44.037) 13.334,46.925 cw(c13.725,44.307) 13.428,46.938 cw(c13.704,44.488) 13.523,46.947 cw(c13.694,44.632) 13.703,46.953 cw(c13.696,45.094) 13.882,46.944 cw(c13.718,45.317) 14.05,46.918 cw(c13.801,45.716) 14.213,46.872 cw(c13.857,45.873) 14.359,46.807 cw(c13.963,46.071) 14.492,46.719 cw(c14.005,46.122) 14.604,46.605 cw(c14.008,46.125) 14.691,46.471 cw(c13.945,46.093) 14.756,46.299 cw(c13.664,46.021) 14.786,46.116 cw(c13.493,46.007) 14.791,46.01 cw(c13.192,46.006) 14.788,45.904 cw(c13.005,46.018) 14.775,45.772 cw(c12.519,46.085) 14.753,45.642 cw(c12.254,46.138) 14.721,45.503 cw(c11.625,46.299) 14.683,45.367 cw(c11.263,46.41) 14.627,45.199 cw(c10.354,46.737) 14.564,45.034 ccw(c18.365,43.495) 14.545,44.987 ccw(c15.109,44.767) 14.529,44.94 ccw(c15.159,44.752) 14.519,44.902 ccw(c15.12,44.761) 14.511,44.863 ccw(c15.097,44.765) 14.504,44.793 ccw(c15.051,44.767) 14.505,44.722 ccw(c15.03,44.766) 14.531,44.596 ccw(c15.012,44.759) 14.588,44.48 ccw(c15.014,44.761) 14.772,44.311 ccw(c15.015,44.762) 15.015,44.25 R24.1@15.765,44.25 C24.2@17.265,44.25
MW31: C21.2 Q1.31 R21.1 | length 4.3
  L6_RF_QD w0.11: 12.98,47.562 ccw(c4.649,67.435) 13.072,47.601 cw(c15.88,40.99) 13.164,47.639 ccw(c12.673,48.842) 13.169,47.641 cw(c13.312,47.297) 13.174,47.643 cw(c13.377,47.132) 13.19,47.649 cw(c13.377,47.132) 13.205,47.655 cw(c13.377,47.132) 13.23,47.662 cw(c13.377,47.132) 13.257,47.669 14.894,48.037 cw(c15.015,47.5) 14.954,48.047 cw(c15.015,47.5) 15.015,48.05 R21.1@15.765,48.05 C21.2@17.265,48.05
MW32: C30.2 Q1.32 R30.1 | length 7.2
  L6_RF_QD w0.11: Q1.32@12.98,48.268 cw(c23.521,31.505) 13.065,48.321 ccw(c9.579,53.927) 13.149,48.375 cw(c13.863,47.264) 13.154,48.378 ccw(c12.954,48.693) 13.159,48.381 ccw(c12.857,48.84) 13.174,48.391 ccw(c12.857,48.84) 13.188,48.401 ccw(c12.857,48.84) 13.215,48.424 ccw(c12.857,48.84) 13.241,48.447 ccw(c12.857,48.84) 13.289,48.5 ccw(c12.857,48.84) 13.329,48.558 ccw(c12.857,48.84) 13.383,48.681 ccw(c12.857,48.84) 13.406,48.814 13.578,52.475 cw(c14.127,52.449) 13.658,52.735 cw(c14.127,52.449) 13.852,52.925 R30.1@14.502,53.3 C30.2@15.801,54.05
MW34: C31.2 Q1.34 R31.1 | length 9.9
  L6_RF_QD w0.11: 12.153,49.88 cw(c49.626,27.48) 12.204,49.966 ccw(c-0.269,57.461) 12.256,50.052 ccw(c8.047,52.541) 12.263,50.064 ccw(c11.239,50.666) 12.27,50.076 ccw(c10.998,50.803) 12.281,50.095 ccw(c10.995,50.805) 12.291,50.114 ccw(c10.993,50.806) 12.31,50.152 ccw(c10.978,50.814) 12.329,50.19 ccw(c10.963,50.821) 12.364,50.274 ccw(c10.887,50.85) 12.395,50.359 ccw(c10.805,50.877) 12.44,50.528 ccw(c10.456,50.951) 12.469,50.7 ccw(c10.19,50.984) 12.484,50.879 ccw(c9.42,51.02) 12.487,51.057 ccw(c8.86,51.013) 12.481,51.242 ccw(c7.062,50.899) 12.466,51.426 ccw(c4.426,50.643) 12.42,51.802 cw(c57.643,58.363) 12.367,52.178 cw(c25.674,53.996) 12.343,52.364 cw(c18.864,53.162) 12.323,52.551 cw(c17.456,53.031) 12.309,52.734 cw(c15.765,52.933) 12.303,52.918 cw(c16.159,52.935) 12.313,53.209 cw(c17.704,52.825) 12.342,53.499 cw(c18.48,52.728) 12.389,53.813 cw(c20.317,52.4) 12.451,54.125 cw(c21.234,52.199) 12.528,54.446 cw(c23.14,51.708) 12.615,54.763 cw(c24.007,51.456) 12.711,55.077 cw(c25.566,50.956) 12.815,55.388 cw(c26.483,50.637) 13.021,55.946 cw(c26.314,50.704) 13.251,56.495 cw(c25.131,51.228) 13.35,56.712 cw(c22.407,52.496) 13.453,56.926 cw(c21.205,53.091) 13.536,57.091 cw(c17.353,55.1) 13.625,57.252 R31.1@14,57.902 C31.2@14.75,59.201
MW35: C32.2 Q1.35 R32.1 | length 14.5
  L6_RF_QD w0.11: Q1.35@11.585,49.88 cw(c136.387,-6.56) 11.667,50.061 ccw(c10.597,50.546) 11.733,50.247 ccw(c10.618,50.541) 11.757,50.356 ccw(c10.565,50.55) 11.769,50.467 ccw(c10.476,50.556) 11.766,50.682 ccw(c10.032,50.512) 11.732,50.896 ccw(c9.65,50.426) 11.669,51.116 ccw(c8.439,50.012) 11.588,51.331 ccw(c7.449,49.597) 11.487,51.553 ccw(c2.865,47.377) 11.378,51.772 ccw(c-4.566,43.54) 11.261,51.995 cw(c34.276,64.29) 11.143,52.218 cw(c21.741,57.749) 11.029,52.442 cw(c15.833,54.822) 10.923,52.669 cw(c14.677,54.314) 10.833,52.893 cw(c13.29,53.802) 10.76,53.123 cw(c12.853,53.684) 10.712,53.35 cw(c12.311,53.6) 10.692,53.58 cw(c15.265,53.635) 10.693,53.695 cw(c32.867,53.406) 10.694,53.809 cw(c23.246,53.581) 10.697,53.938 cw(c24.528,53.544) 10.702,54.067 cw(c25.518,53.507) 10.715,54.357 cw(c28.64,53.328) 10.734,54.647 cw(c31.199,53.139) 10.786,55.232 cw(c39.473,52.291) 10.852,55.815 cw(c44.451,51.678) 10.931,56.415 cw(c58.622,49.675) 11.02,57.014 cw(c68.631,48.132) 11.114,57.607 cw(c108.457,41.572) 11.213,58.198 cw(c157.162,33.245) 11.31,58.758 ccw(c-738.005,189.834) 11.408,59.318 ccw(c-154.064,88.136) 11.495,59.823 ccw(c-37.549,68.21) 11.579,60.328 ccw(c-22.061,65.726) 11.644,60.754 ccw(c-3.21,62.945) 11.701,61.181 ccw(c0.792,62.471) 11.721,61.364 ccw(c4.832,62.062) 11.737,61.546 ccw(c6.191,61.96) 11.746,61.698 ccw(c8.53,61.85) 11.75,61.85 R32.1@11.75,62.6 C32.2@11.75,64.1
S02: C02.1 SMP02.1 | length 5.7
  L6_RF_QD w0.11: SMP02.1@-3.25,40.1 -3.25,42.5 cw(c-2.7,42.5) -3.209,42.709 cw(c-2.7,42.5) -3.091,42.886 -1.906,44.086 cw(c-1.515,43.7) -1.727,44.207 cw(c-1.515,43.7) -1.515,44.25 C02.1@-0.765,44.25
S05: C05.1 SMP05.1 | length 5.9
  L6_RF_QD w0.11: SMP05.1@-3.25,52.2 -3.25,49.65 ccw(c-1.65,49.65) -1.65,48.05 C05.1@-0.765,48.05
S09: C09.1 SMP09.1 | length 5.7
  L6_RF_QD w0.11: SMP09.1@-3.25,58.2 -1.65,58.2 cw(c-1.65,56.8) -0.291,57.138 -0.207,56.799 ccw(c1.151,57.137) 0.451,55.925 C09.1@1.101,55.55
S11: C11.1 SMP11.1 | length 5.7
  L6_RF_QD w0.11: SMP11.1@-3.25,34.1 -1.65,34.1 ccw(c-1.65,35.5) -0.291,35.162 -0.207,35.501 cw(c1.151,35.163) 0.451,36.375 C11.1@1.101,36.75
S12: C12.1 SMP12.1 | length 8.6
  L6_RF_QD w0.11: SMP12.1@-3.25,26.6 0.074,26.6 ccw(c0.074,28.2) 1.46,27.4 C12.1@3.25,30.501
S13: C13.1 SMP13.1 | length 6.7
  L6_RF_QD w0.11: C13.1@11.75,25.2 11.75,24.45 ccw(c13.35,24.45) 13.35,22.85 SMP13.1@16.75,22.85
S15: C15.1 SMP15.1 | length 6.7
  L6_RF_QD w0.11: SMP15.1@2.75,22.85 6.15,22.85 ccw(c6.15,24.45) 7.75,24.45 C15.1@7.75,25.2
S16: C16.1 SMP16.1 | length 8.6
  L6_RF_QD w0.11: C16.1@16.25,30.501 18.04,27.4 ccw(c19.426,28.2) 19.426,26.6 SMP16.1@22.75,26.6
S21: C21.1 SMP21.1 | length 5.9
  L6_RF_QD w0.11: C21.1@20.265,48.05 21.15,48.05 ccw(c21.15,49.65) 22.75,49.65 SMP21.1@22.75,52.2
S24: C24.1 SMP24.1 | length 5.7
  L6_RF_QD w0.11: C24.1@20.265,44.25 21.015,44.25 cw(c21.015,43.7) 21.227,44.207 cw(c21.015,43.7) 21.406,44.086 22.591,42.886 cw(c22.2,42.5) 22.709,42.709 cw(c22.2,42.5) 22.75,42.5 SMP24.1@22.75,40.1
S28: C28.1 SMP28.1 | length 5.7
  L6_RF_QD w0.11: C28.1@18.399,36.75 19.049,36.375 cw(c18.349,35.163) 19.707,35.501 19.791,35.162 ccw(c21.15,35.5) 21.15,34.1 SMP28.1@22.75,34.1
S30: C30.1 SMP30.1 | length 5.7
  L6_RF_QD w0.11: C30.1@18.399,55.55 19.049,55.925 ccw(c18.349,57.137) 19.707,56.799 19.791,57.138 cw(c21.15,56.8) 21.15,58.2 SMP30.1@22.75,58.2
S31: C31.1 SMP31.1 | length 8.6
  L6_RF_QD w0.11: C31.1@16.25,61.799 18.04,64.9 cw(c19.426,64.1) 19.426,65.7 SMP31.1@22.75,65.7
S32: C32.1 SMP32.1 | length 6.7
  L6_RF_QD w0.11: C32.1@11.75,67.1 11.75,67.85 cw(c13.35,67.85) 13.35,69.45 SMP32.1@16.75,69.45
S34: C34.1 SMP34.1 | length 6.7
  L6_RF_QD w0.11: SMP34.1@2.75,69.45 6.15,69.45 cw(c6.15,67.85) 7.75,67.85 C34.1@7.75,67.1
S35: C35.1 SMP35.1 | length 8.6
  L6_RF_QD w0.11: SMP35.1@-3.25,65.7 0.074,65.7 cw(c0.074,64.1) 1.46,64.9 C35.1@3.25,61.799
pads on no net: J1.29 J1.31 J1.33 J1.35 J1.37 J1.39 J1.41 J1.43 J1.45 J1.47 J1.49 J1.50 J1.51 J1.52 J1.53

## Other copper
L1_GND:
  region net GND: 5 vertices and 48 holes, not listed, extent -6.35,-11.375 25.85,87.25
L2_DC_A:
  region net GND: 5 vertices and 24 holes, not listed, extent -6.35,-11.375 25.85,87.25
L3_DC_B:
  region net GND: 5 vertices and 24 holes, not listed, extent -6.35,-11.375 25.85,87.25
L4_GND:
  region net GND: 5 vertices and 47 holes, not listed, extent -6.35,-11.375 25.85,87.25
L5_GND:
  pour cut-out: 3.801,56.344 5.274,57.194 6.226,57.744 5.726,58.61 4.254,57.76 3.301,57.21
  pour cut-out: 5.5,62.1 8.3,62.1 8.3,63.1 5.5,63.1
  pour cut-out: 11.2,62.1 14,62.1 14,63.1 11.2,63.1
  pour cut-out: 15.699,56.344 16.199,57.21 15.246,57.76 13.774,58.61 13.274,57.744 14.226,57.194
  pour cut-out: 15.194,51.101 16.06,51.601 15.21,53.074 14.66,54.026 13.794,53.526 14.644,52.054
  pour cut-out: 14.66,38.274 15.21,39.226 16.06,40.699 15.194,41.199 14.644,40.246 13.794,38.774
  pour cut-out: 15.265,42 16.265,42 16.265,44.8 15.265,44.8
  pour cut-out: 15.265,47.5 16.265,47.5 16.265,50.3 15.265,50.3
  pour cut-out: 13.774,33.69 16.199,35.09 15.699,35.956 13.274,34.556
  pour cut-out: 5.5,29.2 8.3,29.2 8.3,30.2 5.5,30.2
  pour cut-out: 11.2,29.2 14,29.2 14,30.2 11.2,30.2
  pour cut-out: 5.726,33.69 6.226,34.556 5.274,35.106 3.801,35.956 3.301,35.09 4.254,34.54
  pour cut-out: 4.84,38.274 5.706,38.774 4.306,41.199 3.44,40.699
  pour cut-out: 4.306,51.101 5.706,53.526 4.84,54.026 3.44,51.601
  pour cut-out: 3.235,47.5 4.235,47.5 4.235,50.3 3.235,50.3
  pour cut-out: 3.235,42 4.235,42 4.235,44.8 3.235,44.8
  pour cut-out: 4.221,58.318 5.779,59.218 4.279,61.816 3.779,62.682 2.221,61.782 3.721,59.184
  pour cut-out: 6.85,63.6 8.65,63.6 8.65,67.6 6.85,67.6
  pour cut-out: 10.85,63.6 12.65,63.6 12.65,67.6 10.85,67.6
  pour cut-out: 15.279,58.318 15.779,59.184 17.279,61.782 15.721,62.682 15.221,61.816 13.721,59.218
  pour cut-out: 15.818,53.021 18.416,54.521 19.282,55.021 18.382,56.579 15.784,55.079 14.918,54.579
  pour cut-out: 18.382,35.721 19.282,37.279 15.818,39.279 14.918,37.721
  pour cut-out: 16.765,43.35 20.765,43.35 20.765,45.15 16.765,45.15
  pour cut-out: 16.765,47.15 20.765,47.15 20.765,48.95 16.765,48.95
  pour cut-out: 15.721,29.618 17.279,30.518 15.279,33.982 13.721,33.082
  pour cut-out: 6.85,24.7 8.65,24.7 8.65,28.7 6.85,28.7
  pour cut-out: 10.85,24.7 12.65,24.7 12.65,28.7 10.85,28.7
  pour cut-out: 3.779,29.618 5.779,33.082 4.221,33.982 2.221,30.518
  pour cut-out: 1.118,35.721 4.582,37.721 3.682,39.279 0.218,37.279
  pour cut-out: 3.682,53.021 4.582,54.579 1.118,56.579 0.218,55.021
  pour cut-out: -1.265,47.15 2.735,47.15 2.735,48.95 -1.265,48.95
  pour cut-out: -1.265,43.35 2.735,43.35 2.735,45.15 -1.265,45.15
  region net GND: 5 vertices and 63 holes, not listed, extent -6.35,-11.375 25.85,87.25
L6_RF_QD:
  region net GND: 5 vertices and 35 holes, not listed, extent -6.35,-11.375 25.85,87.25

## Silkscreen, mask and mechanical layers (free items; w line width, h text height)
Top Solder:
  region: 59 vertices and 46 holes, not listed, extent -6.65,-11.625 26.15,87.5
Bottom Solder:
  drawing of 14 lines, arcs and shapes, not listed
Mechanical 1:
  the board outline again, w0.05
Mechanical 3:
  lines w0.05: 7.6,44 ccw(c8.1,44) 8.1,43.5 11.4,43.5 ccw(c11.4,44) 11.9,44 11.9,48.3 ccw(c11.4,48.3) 11.4,48.8 8.1,48.8 ccw(c8.1,48.3) 7.6,48.3 7.6,44
  text "BOTTOM BLIND POCKET: 4.3 x 5.3 mm, R0.5, DEPTH 1.2 mm FROM BOTTOM; NON-PLATED; NON-THROUGH" at 21,43 h0.8